# Altium PCB MiniDisplay.PcbDoc (part 1 of 2)
Units mil, origin at the board's own origin, x right, y up, seen from the top; angles counter-clockwise.
Board outline 1690.11 x 1520.11 mil, 2 copper layers (Top1, Bottom2), stack 12.8 mil thick; 78 components, 93 nets, 423 pads, 283 vias.
Unrouted connection lines stored in the file: 98.
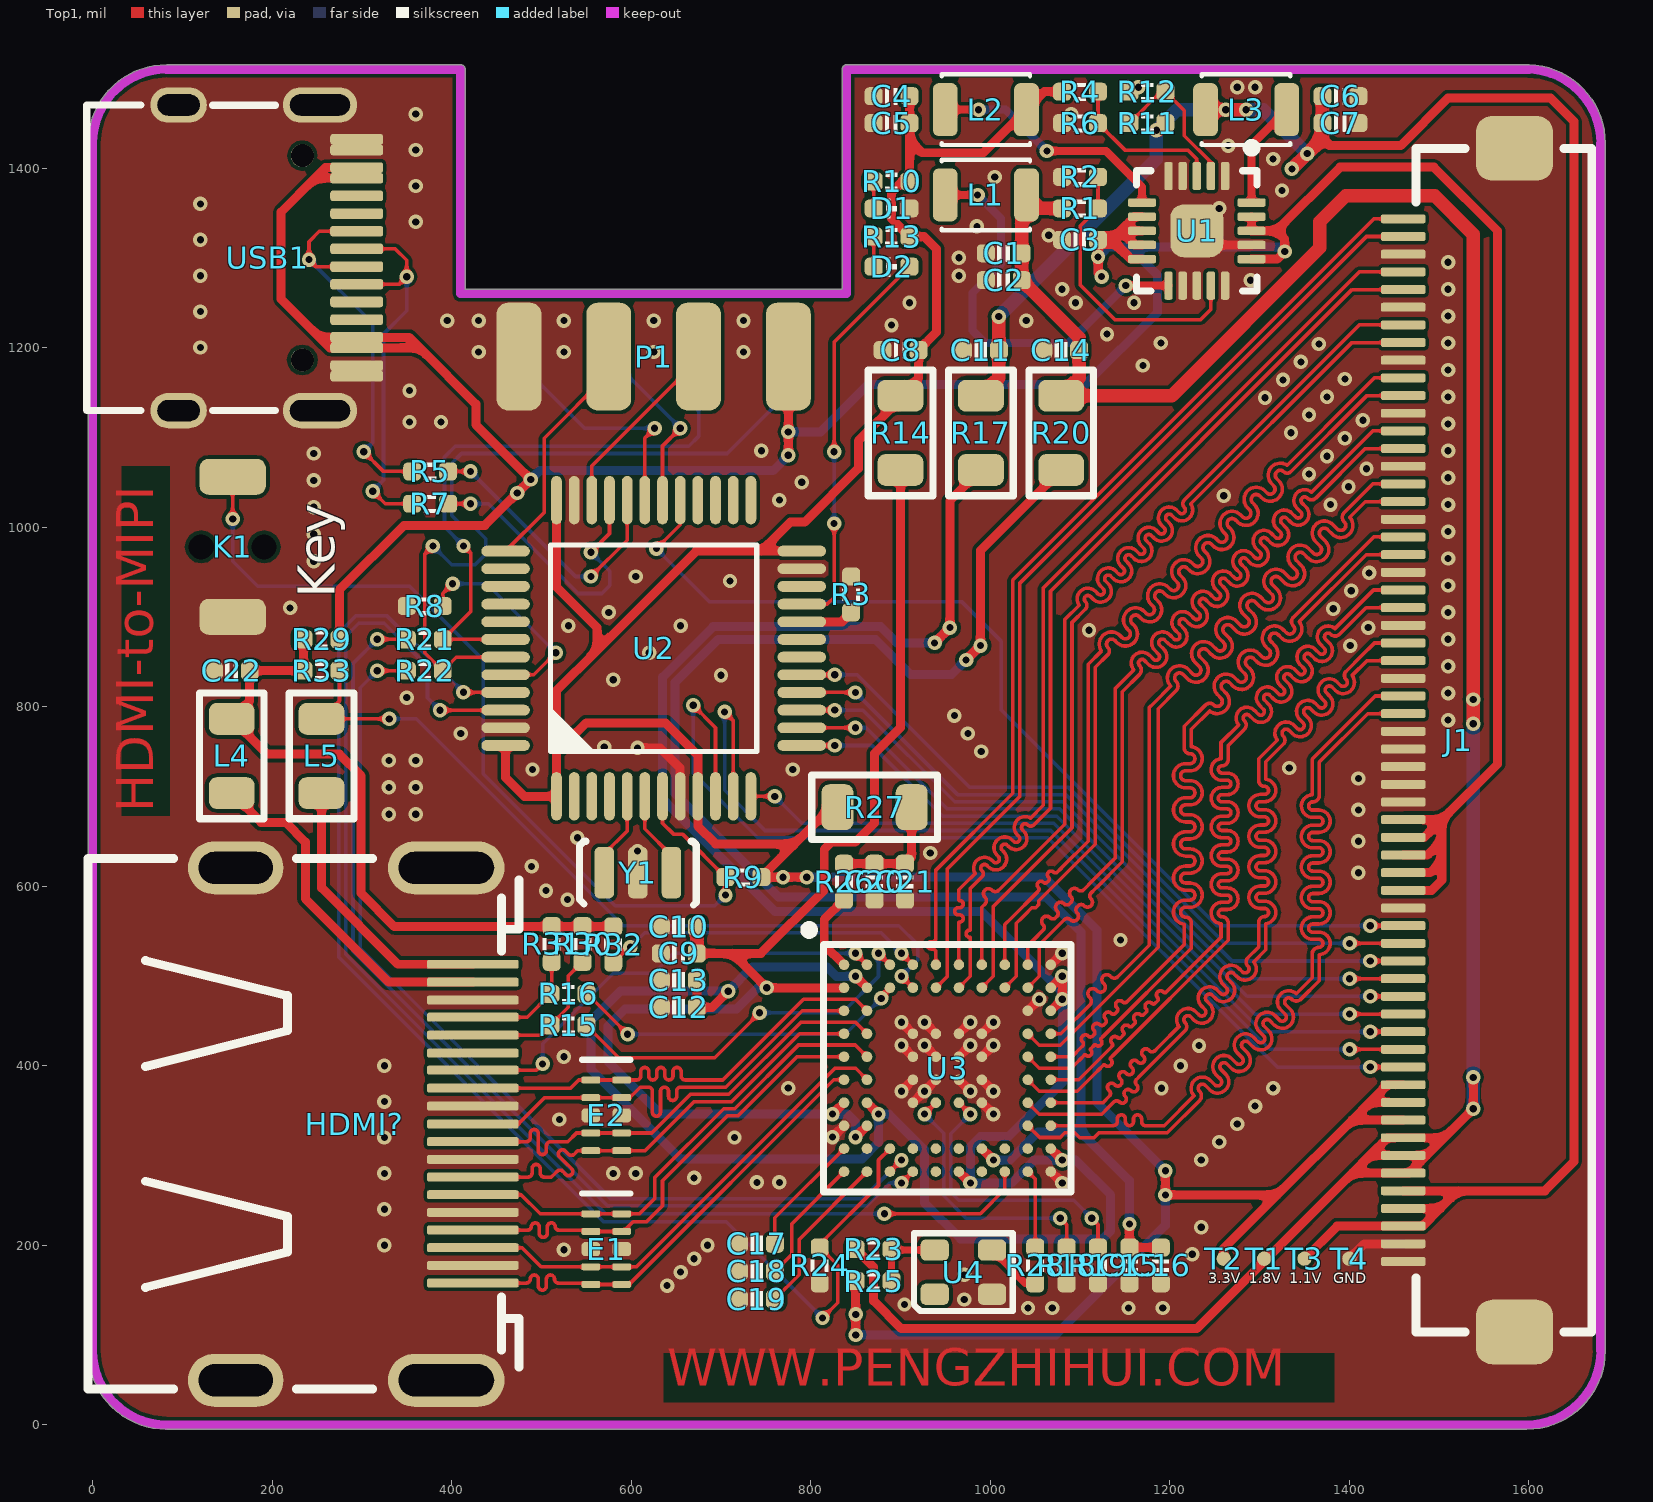
[diagram p0: Top1 view]
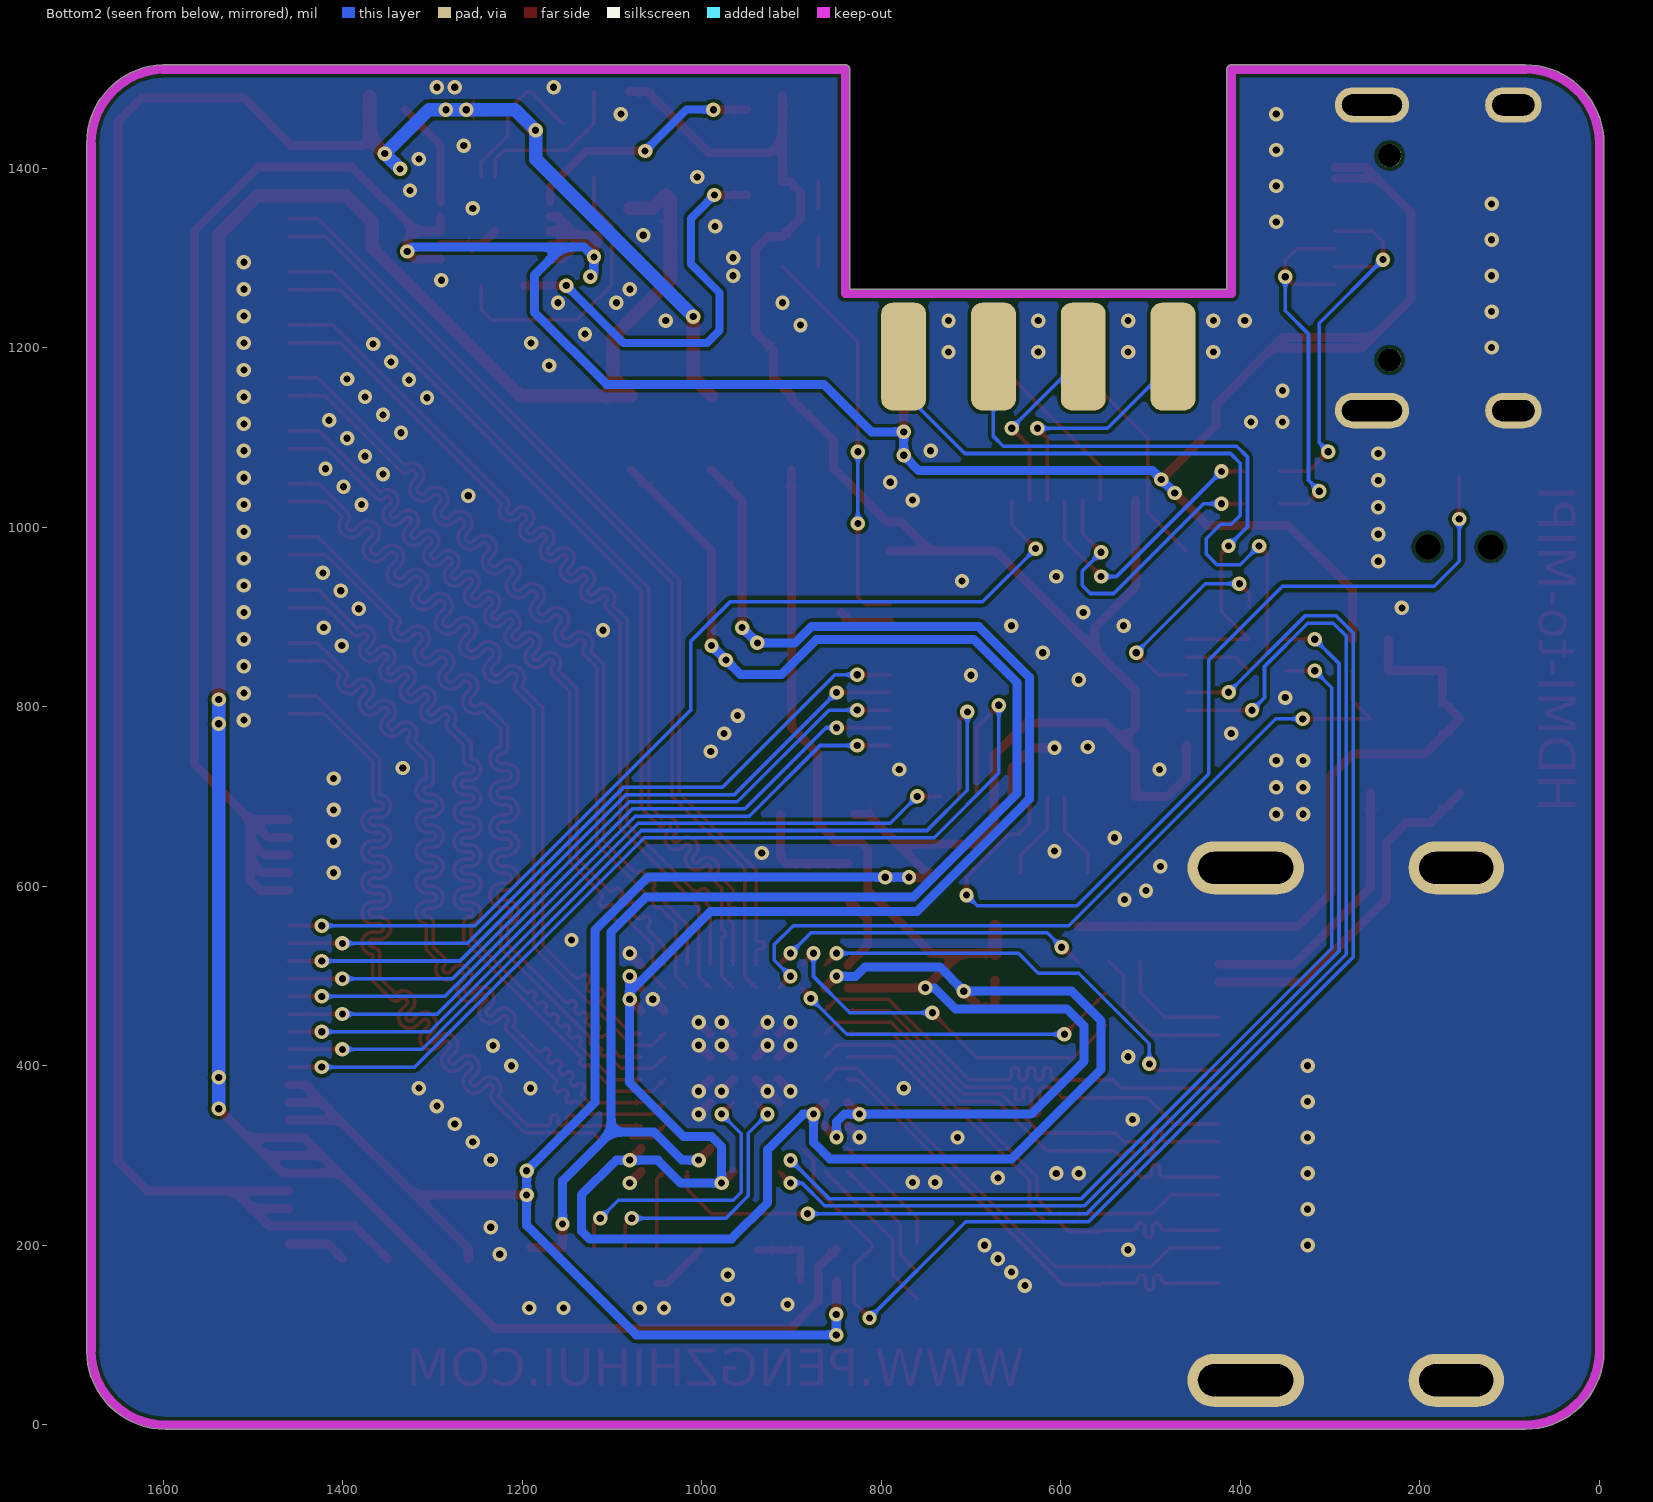
[diagram p1: Bottom2 view, seen from below]
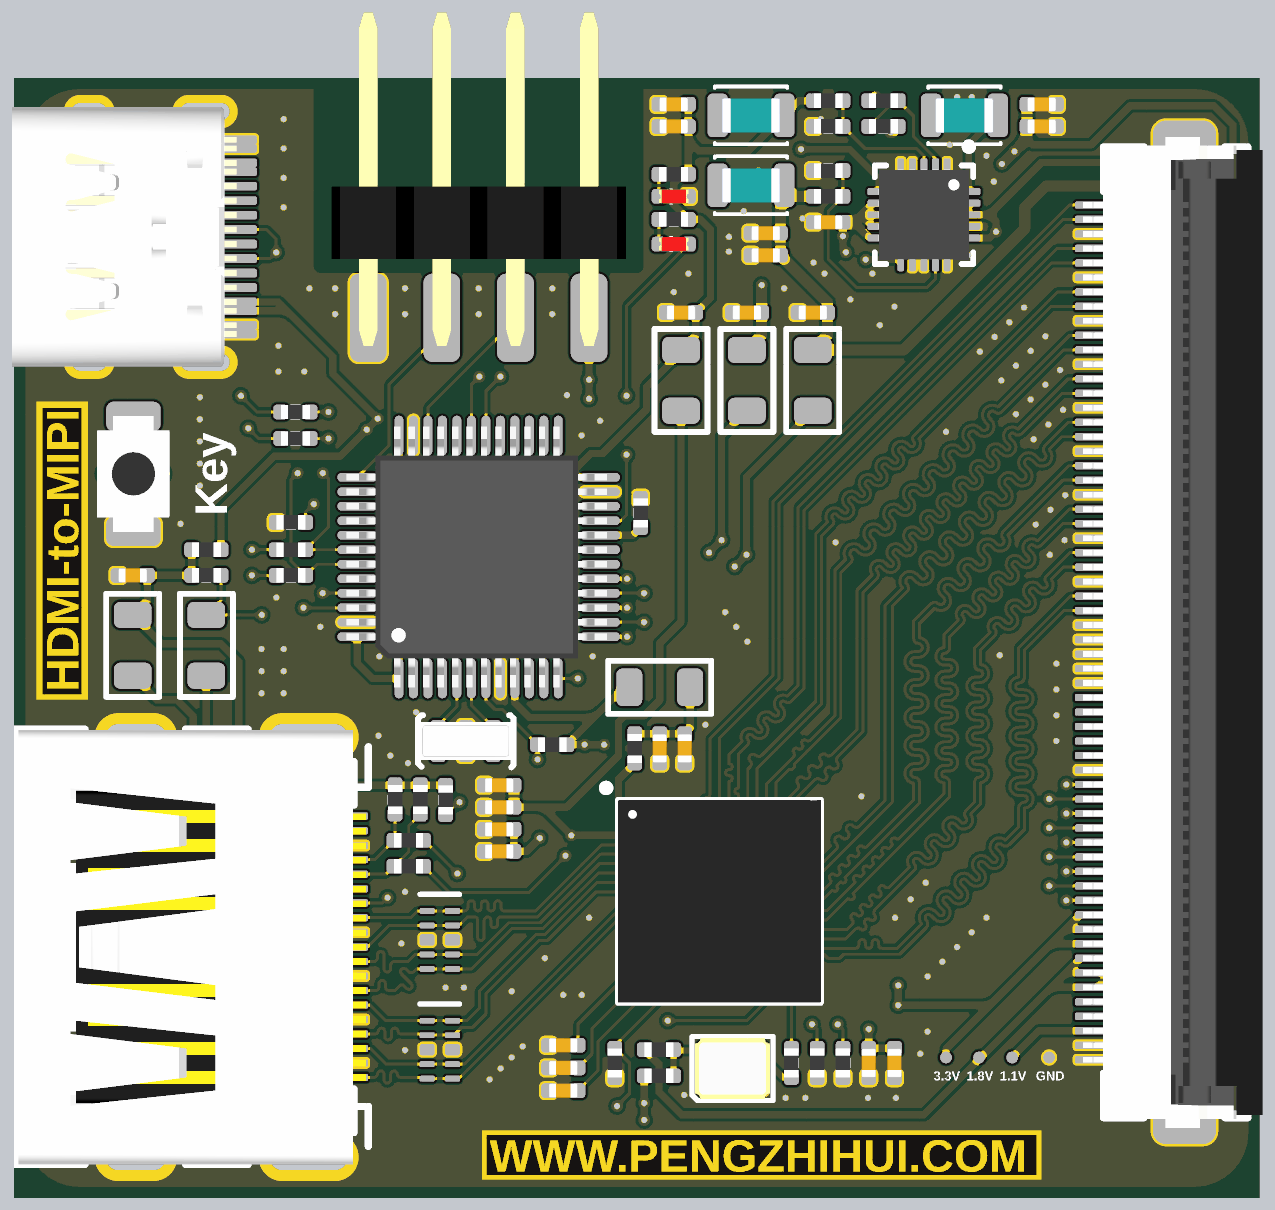
[diagram p3: 3D render of the assembled board from above, using the file's embedded part models]

## Layer stack, top to bottom
Top Solder: solder mask 0.4, Solder Resist, Dk 3.5
Top1: signal copper 1.4
Dielectric1: core 10, FR-4, Dk 4.2
Bottom2: signal copper 1.4
Bottom Solder: solder mask 0.4, Solder Resist, Dk 3.5

## Board outline
-5.01,82.45 cw(c0,82.5) -5.02,82.5 -5.02,1426.85 cw(c-0.04,1427.46) -5.05,1427.46 cw(c82.5,1427.46) 82.5,1515.02 410,1515.02 cw(c410,1510) 415.02,1510 415.02,1265.02 834.99,1265.02 834.99,1510 cw(c840,1510) 840,1515.02 1596.89,1515.02 cw(c1597.5,1510.04) 1597.5,1515.05 cw(c1597.5,1427.5) 1600.15,1515.01 cw(c1597.5,1427.5) 1685.05,1427.5 cw(c1680.04,1427.5) 1685.02,1426.88 1685.01,83.15 cw(c1680.04,82.54) 1685.05,82.54 cw(c1597.5,82.54) 1597.53,-5.01 cw(c1597.5,0) 1597.5,-5.02 83.15,-5.02 cw(c82.54,-0.04) 82.54,-5.05 cw(c82.54,82.5)

## Design rules (kind name [scope] priority, off if disabled: settings)
Clearance [All] p1: gap=4 ignorepadtopadclearanceinfootprint=FALSE except(0: Arc-Hole Track-Hole SMDPad-Hole THPad-Hole Via-Hole Fill-Hole Poly-Hole Region-Hole Text-Hole)
ComponentClearance [All] p1: gap=0 collisioncheckmode=3 verticalgap=0 showdistances=FALSE
DiffPairsRouting [All] p1: maxlimit=9 minlimit=4 mostfreqgap=4 toplayer_minwidth=4 toplayer_maxwidth=15 toplayer_prefwidth=4 bottomlayer_minwidth=4 bottomlayer_maxwidth=15 bottomlayer_prefwidth=4 maxuncoupledlength=500
FanoutControl Fanout_BGA [All] p1: bgadir=Out bgaviamode=Centered fanoutstyle=Auto fanoutdirection=Alternating viagrid=1 // Fanout_BGA (Default Rule)
HoleSize [All] p1: absolutevalues=TRUE maxlimit=10000 minlimit=8 maxpercent=80.000 minpercent=20.000
MinimumSolderMaskSliver [All] p1 off: minsoldermaskwidth=2
PlaneClearance [All] p1: clearance=8
PlaneConnect [All] p1: planeconnectstyle=Direct reliefexpansion=20 reliefentries=4 reliefconductorwidth=10 reliefairgap=10
PolygonConnect [All] p1: connectstyle=Direct reliefconductorwidth=10 reliefentries=4 polygonreliefangle="90 Angle" airgapwidth=10
RoutingVias [All] p1: holewidth=8 width=16 viastyle="Through Hole" minholewidth=6 minwidth=12 maxholewidth=28 maxwidth=50
SilkToSilkClearance [All] p1: silktosilkclearance=0
SilkToSolderMaskClearance [IsPad] p1: minsilkscreentomaskgap=0 clearancetoexposedcopper=TRUE
SolderMaskExpansion [All] p1: expansion=3
Width GND [(InNet('AGND') OR InNet('GND'))] p1: maxlimit=50 minlimit=4 preferedwidth=10
Width VCC [(InNet('VDD_SYS_3.3V') OR InNet('VDD_AV_3.3V') OR InNet('VDD_5V') OR InNet('VDD1V2-SYS') OR InNet('VDD1V1-EPHY') OR InNet('VDD-CPUX') OR InNet('NetC15_2') OR InNet('NetC9_2') OR InNet('NetC12_2'))] p2: maxlimit=50 minlimit=4 preferedwidth=10
Width [All] p3: maxlimit=10000 minlimit=4 preferedwidth=4
21 further rules are at their usual default settings.

## Classes and differential pairs
net class MIPI: MIPI0_D0_N MIPI0_D0_P MIPI0_D1_N MIPI0_D1_P MIPI0_D2_N MIPI0_D2_P MIPI0_D3_N MIPI0_D3_P MIPI0_DC_N MIPI0_DC_P MIPI1_D0_N MIPI1_D0_P MIPI1_D1_N MIPI1_D1_P MIPI1_D2_N MIPI1_D2_P MIPI1_D3_N MIPI1_D3_P MIPI1_DC_N MIPI1_DC_P
net class HDMI: HDMIC_N HDMIC_P HDMID0_N HDMID0_P HDMID1_N HDMID1_P HDMID2_N HDMID2_P
component class U_Connector: C22 E1 E2 HDMI? J1 L4 L5 R29 R30 R31 R32 R33
component class TC358870XBG: C8 C9 C10 C11 C12 C13 C14 C15 C16 C17 C18 C19 C20 C21 R14 R15 R16 R17 R18 R19 R20 R21 R22 R23 R24 R25 R26 R27 R28 U3 U4
component class Main: C1 C2 C3 C4 C5 C6 C7 D1 D2 K1 L1 L2 L3 P1 R1 R2 R3 R4 R5 R6 R7 R8 R9 R10 R11 R12 R13 T1 T2 T3 T4 U1 U2 USB1 Y1
differential pair MIPI1_DC: +MIPI1_DC_P -MIPI1_DC_N
differential pair MIPI1_D3: +MIPI1_D3_P -MIPI1_D3_N
differential pair MIPI1_D2: +MIPI1_D2_P -MIPI1_D2_N
differential pair MIPI1_D1: +MIPI1_D1_P -MIPI1_D1_N
differential pair MIPI1_D0: +MIPI1_D0_P -MIPI1_D0_N
differential pair MIPI0_DC: +MIPI0_DC_P -MIPI0_DC_N
differential pair MIPI0_D3: +MIPI0_D3_P -MIPI0_D3_N
differential pair MIPI0_D2: +MIPI0_D2_P -MIPI0_D2_N
differential pair MIPI0_D1: +MIPI0_D1_P -MIPI0_D1_N
differential pair MIPI0_D0: +MIPI0_D0_P -MIPI0_D0_N
differential pair HDMID2: +HDMID2_P -HDMID2_N
differential pair HDMID1: +HDMID1_P -HDMID1_N
differential pair HDMID0: +HDMID0_P -HDMID0_N
differential pair HDMIC: +HDMIC_P -HDMIC_N
differential pair USB: +USB_P -USB_N

## Components (designator, comment, footprint, x,y, rotation, side; value= is the part's Value field where it differs from the comment)
C1 "10uF" CAP_0402 1015,1305 r0 top value=0.1u
C2 "0.1uF" CAP_0402 1015,1275 r180 top value=0.1u
C3 "10uF" CAP_0402 1100,1320 r0 top value=0.1u
C4 "10uF" CAP_0402 890,1480 r0 top value=0.1u
C5 "0.1uF" CAP_0402 890,1450 r180 top value=0.1u
C6 "10uF" CAP_0402 1390,1480 r180 top value=0.1u
C7 "0.1uF" CAP_0402 1390,1450 r0 top value=0.1u
C8 "10uF" CAP_0402 900,1197.12 r0 top value=0.1u
C9 "10nF" CAP_0402 653,525 r0 top value=0.1u
C10 "0.1uF" CAP_0402 653,555 r0 top value=0.1u
C11 "10uF" CAP_0402 989.5,1197.12 r0 top value=0.1u
C12 "10nF" CAP_0402 653,465 r0 top value=0.1u
C13 "0.1uF" CAP_0402 653,495 r0 top value=0.1u
C14 "10uF" CAP_0402 1079,1197.12 r0 top value=0.1u
C15 "10nF" CAP_0402 1155,177.52 r90 top value=0.1u
C16 "0.1uF" CAP_0402 1190,177.52 r90 top value=0.1u
C17 "0.1uF" CAP_0402 740,201.61 r180 top value=0.1u
C18 "0.1uF" CAP_0402 740,170.81 r180 top value=0.1u
C19 "0.1uF" CAP_0402 740,140 r180 top value=0.1u
C20 "10nF" CAP_0402 871.02,605 r90 top value=0.1u
C21 "0.1uF" CAP_0402 905,605 r90 top value=0.1u
C22 "10uF" CAP_0402 155,840 r0 top value=0.1u
D1 "color?" LED_0402_RED 890,1355 r0 top
D2 "color?" LED_0402_RED 890,1290.16 r0 top
E1 "E?" DFN-2510 572.22,195.63 r270 top
E2 "E?" DFN-2510 572.22,344.69 r270 top
HDMI? "HDMI-SWM-19" HDMI-SWM-19 205,335 r90 top
J1 "0.5S_A_60PWB" FFC_0.5_60 1520,762.64 r90 top locked
K1 "TACT 2P" ButtonTACT_3x4x2_180H 156,978 r270 top value=3x4
L1 "2.2uH" 2520-L 995,1370 r0 top
L2 "2.2uH" 2520-L 995,1465 r0 top
L3 "2.2uH" 2520-L 1285,1465 r180 top
L4 "10uH" 0805-L 155,745 r270 top
L5 "10uH" 0805-L 255,745 r270 top
P1 "HDR2x4_2.54" HDR2X4_2.54_180H 475,1190 r90 top
R1 "200K" RES_0402 1100,1355 r180 top value=22R
R2 "100K" RES_0402 1100,1390 r0 top value=22R
R3 "10K" RES_0402 845,925 r90 top value=22R
R4 "510K" RES_0402 1100,1485 r180 top value=22R
R5 "22R" RES_0402 376,1062 r0 top
R6 "110K" RES_0402 1100,1450 r0 top value=22R
R7 "22R" RES_0402 376,1026 r0 top
R8 "10K" RES_0402 370,912 r180 top value=22R
R9 "10K" RES_0402 725,610 r0 top value=22R
R10 "1K" RES_0402 890,1385 r180 top value=22R
R11 "92K" RES_0402 1175,1450 r0 top value=22R
R12 "110K" RES_0402 1175,1485 r0 top value=22R
R13 "1K" RES_0402 890,1323.66 r180 top value=22R
R14 "120R磁珠" 0805-L 900,1105 r90 top value=22R
R15 "33R" RES_0402 530,445 r0 top value=22R
R16 "33R" RES_0402 530,480 r0 top value=22R
R17 "120R磁珠" 0805-L 989.5,1105 r90 top value=22R
R18 "10K" RES_0402 1085,177.52 r90 top value=22R
R19 "10K" RES_0402 1120,177.52 r90 top value=22R
R20 "120R磁珠" 0805-L 1079,1105 r90 top value=22R
R21 "33R" RES_0402 370,874.84 r180 top value=22R
R22 "33R" RES_0402 370,840 r180 top value=22R
R23 "0R" RES_0402 870,195.63 r180 top value=22R
R24 "47K" RES_0402 810,177.52 r270 top value=22R
R25 "NC" RES_0402 870,160 r180 top value=22R
R26 "2K 0.1%" RES_0402 837.05,605 r90 top value=22R
R27 "120R磁珠" 0805-L 871.02,688 r180 top value=22R
R28 "33R" RES_0402 1050,177.52 r90 top value=22R
R29 "NC?" RES_0402 255,875 r180 top value=22R
R30 "47K" RES_0402 545.71,535.63 r90 top value=22R
R31 "47K" RES_0402 511.42,535.63 r90 top value=22R
R32 "1K 1%" RES_0402 580,535 r90 top value=22R
R33 "1K 1%" RES_0402 255,840 r0 top value=22R
T1 "测试点" TEST_PT 1305,184.99 r0 top
T2 "测试点" TEST_PT 1260,184.99 r0 top
T3 "测试点" TEST_PT 1350,184.99 r0 top
T4 "测试点" TEST_PT 1400,185 r0 top
U1 "EA3036" QFN-20 1230,1330 r270 top
U2 "STM32F103CBT6" LQFP-48 625,865 r90 top
U3 "TC358870XBG" VFBGA-80 952.2,397.2 r0 top
U4 "晶振-4Pin" 晶振2520 970,170 r0 top
USB1 "Type-C" Type-C-TOP 195,1300 r180 top
Y1 "8MHz" 晶振-3P 607.4,615 r180 top

## Footprints (in the part's own frame and the unit in brackets; to place one, negate y for a bottom-side part, rotate by r counter-clockwise, add the part's x,y. Pads: shape width x height; smd on the part's side, far side on the other; paste and mask are expansions set on the pad)
0805-L [mm]
  rrect50% 0.9x1.3 smd: 1(-1.05,0) 2(1.05,0)
  silkscreen extent -1.78,-0.91 1.78,0.91, body extent -1,-0.6 1,0.6, height 0.76
2520-L [mm]
  rrect50% 0.7x1.5 smd: 1(-1.15,0) 2(1.15,0)
  silkscreen extent -1.25,-1 1.25,1, body extent -1,-0.6 1,0.6, height 0.92
ButtonTACT_3x4x2_180H [mil]
  round 0 hole 28: 0(0,35) 0(0,-35)
  rrect50% 40x74 smd: 1(-78,0) 2(78,0)
  body extent -79,-49 79,49, height 63
CAP_0402 [mil]
  rrect50% 20x20 smd: 1(-20,0) 2(20,0)
  silkscreen extent -6,-9 6,9, body extent -20,-10 20,10, height 20
DFN-2510 [mm]
  rrect50% 0.2x0.525 smd: 1(-1,-0.437) 2(-0.5,-0.437) 4(0.5,-0.437) 5(1,-0.437) 6(1,0.437) 7(0.5,0.437) 9(-0.5,0.437) 10(-1,0.437)
  rrect50% 0.4x0.525 smd: 3(0,-0.437) 8(0,0.437)
  silkscreen extent -1.57,-0.69 -1.57,0.69
FFC_0.5_60 [mil]
  rrect50% 72x86 smd: 0(-659.33,-63.98) 0(659.33,-63.98)
  rrect50% 10x50 smd: 1(-580.71,60) 2(-561.02,60) 3(-541.34,60) 4(-521.65,60) 5(-501.97,60) 6(-482.28,60) 7(-462.6,60) 8(-442.91,60) 9(-423.23,60) 10(-403.54,60) 11(-383.86,60) 12(-364.17,60) 13(-344.49,60) 14(-324.8,60) 15(-305.12,60) 16(-285.43,60) 17(-265.75,60) 18(-246.06,60) 19(-226.38,60) 20(-206.69,60) 21(-187.01,60) 22(-167.32,60) 23(-147.64,60) 24(-127.95,60) 25(-108.27,60) 26(-88.58,60) 27(-68.9,60) 28(-49.21,60) 29(-29.53,60) 30(-9.84,60) 31(9.84,60) 32(29.53,60) 33(49.21,60) 34(68.9,60) 35(88.58,60) 36(108.27,60) 37(127.95,60) 38(147.64,60) 39(167.32,60) 40(187.01,60) 41(206.69,60) 42(226.38,60) 43(246.06,60) 44(265.75,60) 45(285.43,60) 46(305.12,60) 47(324.8,60) 48(344.49,60) 49(364.17,60) 50(383.86,60) 51(403.54,60) 52(423.23,60) 53(442.91,60) 54(462.6,60) 55(482.28,60) 56(501.97,60) 57(521.65,60) 58(541.34,60) 59(561.02,60) 60(580.71,60)
  silkscreen extent -659,-150 659,46, body extent -673,-170 673,74, height 79
HDMI-SWM-19 [mm] "HDMI-SWM-19"
  rrect50% 0.254x2.6 smd: 1(-4.5,-5.55) 2(-4,-5.55) 3(-3.5,-5.55) 4(-3,-5.55) 5(-2.5,-5.55) 6(-2,-5.55) 7(-1.5,-5.55) 8(-1,-5.55) 9(-0.5,-5.55) 10(0,-5.55) 11(0.508,-5.55) 12(1.016,-5.55) 13(1.524,-5.55) 14(2.007,-5.55) 15(2.515,-5.55) 16(3.023,-5.55) 17(3.505,-5.55) 18(4.013,-5.55) 19(4.521,-5.55)
  oval 1.5x2.7 hole 2.1 slot 0.9 at 0 deg: SH1(-7.25,1.16) SH2(7.25,1.16)
  oval 1.5x3.3 hole 2.7 slot 0.9 at 0 deg: SH3(-7.25,-4.8) SH4(7.25,-4.8)
  silkscreen extent -7.5,-6.86 7.52,5.33, body extent -7.5,-6.78 7.5,5.22, height 6.14
HDR2X4_2.54_180H [mil]
  rrect50% 120x50 smd: 1(0,0) 3(0,-100) 5(0,-200) 7(0,-300)
  rrect50% 120x50 smd far side: 2(0,0) 4(0,-100) 6(0,-200) 8(0,-300)
  body extent -38,-350 415,50, height 100
LED_0402_RED [mil]
  rrect50% 20x20 smd: 1(-20,0) 2(20,0)
  silkscreen extent -6,-10 6,10, body extent -20,-10 20,10, height 18
LQFP-48 [mil]
  oval 54x12 smd: 1(-165,108.27) 2(-165,88.58) 3(-165,68.9) 4(-165,49.21) 5(-165,29.53) 6(-165,9.84) 7(-165,-9.84) 8(-165,-29.53) 9(-165,-49.21) 10(-165,-68.9) 11(-165,-88.58) 12(-165,-108.27) 25(165,-108.27) 26(165,-88.58) 27(165,-68.9) 28(165,-49.21) 29(165,-29.53) 30(165,-9.84) 31(165,9.84) 32(165,29.53) 33(165,49.21) 34(165,68.9) 35(165,88.58) 36(165,108.27)
  oval 12x54 smd: 13(-108.27,-165) 14(-88.58,-165) 15(-68.9,-165) 16(-49.21,-165) 17(-29.53,-165) 18(-9.84,-165) 19(9.84,-165) 20(29.53,-165) 21(49.21,-165) 22(68.9,-165) 23(88.58,-165) 24(108.27,-165) 37(108.27,165) 38(88.58,165) 39(68.9,165) 40(49.21,165) 41(29.53,165) 42(9.84,165) 43(-9.84,165) 44(-29.53,165) 45(-49.21,165) 46(-68.9,165) 47(-88.58,165) 48(-108.27,165)
  silkscreen extent -115,-115 115,115, body extent -177,-175 177,180, height 61
QFN-20 [mm] "QFN, 20-Leads, Body 3.00x3.00mm, Pitch 0.40mm, Thermal Pad 1.65x1.65mm, IPC Medium Density"
  rrect50% 0.8x0.24 smd: 1(-1.55,0.8) 2(-1.55,0.4) 3(-1.55,0) 4(-1.55,-0.4) 5(-1.55,-0.8) 11(1.55,-0.8) 12(1.55,-0.4) 13(1.55,0) 14(1.55,0.4) 15(1.55,0.8)
  rrect50% 0.24x0.8 smd: 6(-0.8,-1.55) 7(-0.4,-1.55) 8(0,-1.55) 9(0.4,-1.55) 10(0.8,-1.55) 16(0.8,1.55) 17(0.4,1.55) 18(0,1.55) 19(-0.4,1.55) 20(-0.8,1.55)
  rrect50% 1.5x1.5 smd: 21(0,0)
  silkscreen extent -2.47,-1.7 1.7,1.7, body extent -1.56,-1.56 1.56,1.56, height 0.8
RES_0402 [mil]
  rrect50% 20x20 smd: 1(-20,0) 2(20,0)
  silkscreen extent -7,-10 7,10, body extent -20,-10 20,10, height 14
TEST_PT [mil]
  rrect100% 16x16 smd: 0(0,0.01)
Type-C-TOP [mm]
  round 0.65 hole 0.65: 0(-0.98,2.89) 0(-0.98,-2.89)
  oval 1.6x1 hole 0.6 slot 1.2 at 0 deg: 1(2.52,4.325) 2(2.52,-4.325)
  oval 2.1x1 hole 0.6 slot 1.7 at 0 deg: 3(-1.48,-4.325) 4(-1.48,4.325)
  rrect50% 1.5x0.3 smd: A1(-2.52,-3.35) A4(-2.52,-2.55) A5(-2.52,-1.25) A6(-2.52,-0.25) A7(-2.52,0.25) A8(-2.52,1.25) A9(-2.52,2.55) A12(-2.52,3.35) B1(-2.52,3.05) B4(-2.52,2.25) B5(-2.52,1.75) B6(-2.52,0.75) B7(-2.52,-0.75) B8(-2.52,-1.75) B9(-2.52,-2.25) B12(-2.52,-3.05)
  silkscreen extent -0.22,-4.33 5.12,4.33, body extent -2.57,-4.48 5.18,4.48, height 3.26
VFBGA-80 [mm]
  round 0.3 smd paste+0 mask+0: A1(-2.925,2.925) A2(-2.275,2.925) A3(-1.625,2.925) A4(-0.975,2.925) A5(-0.325,2.925) A6(0.325,2.925) A7(0.975,2.925) A8(1.625,2.925) A9(2.275,2.925) A10(2.925,2.925) B1(-2.925,2.275) B2(-2.275,2.275) B3(-1.625,2.275) B4(-0.975,2.275) B5(-0.325,2.275) B6(0.325,2.275) B7(0.975,2.275) B8(1.625,2.275) B9(2.275,2.275) B10(2.925,2.275) C1(-2.925,1.625) C2(-2.275,1.625) C9(2.275,1.625) C10(2.925,1.625) D1(-2.925,0.975) D2(-2.275,0.975) D4(-0.975,0.975) D5(-0.325,0.975) D6(0.325,0.975) D7(0.975,0.975) D9(2.275,0.975) D10(2.925,0.975) E1(-2.925,0.325) E2(-2.275,0.325) E4(-0.975,0.325) E5(-0.325,0.325) E6(0.325,0.325) E7(0.975,0.325) E9(2.275,0.325) E10(2.925,0.325) F1(-2.925,-0.325) F2(-2.275,-0.325) F4(-0.975,-0.325) F5(-0.325,-0.325) F6(0.325,-0.325) F7(0.975,-0.325) F9(2.275,-0.325) F10(2.925,-0.325) G1(-2.925,-0.975) G2(-2.275,-0.975) G4(-0.975,-0.975) G5(-0.325,-0.975) G6(0.325,-0.975) G7(0.975,-0.975) G9(2.275,-0.975) G10(2.925,-0.975) H1(-2.925,-1.625) H2(-2.275,-1.625) H9(2.275,-1.625) H10(2.925,-1.625) J1(-2.925,-2.275) J2(-2.275,-2.275) J3(-1.625,-2.275) J4(-0.975,-2.275) J5(-0.325,-2.275) J6(0.325,-2.275) J7(0.975,-2.275) J8(1.625,-2.275) J9(2.275,-2.275) J10(2.925,-2.275) K1(-2.925,-2.925) K2(-2.275,-2.925) K3(-1.625,-2.925) K4(-0.975,-2.925) K5(-0.325,-2.925) K6(0.325,-2.925) K7(0.975,-2.925) K8(1.625,-2.925) K9(2.275,-2.925) K10(2.925,-2.925)
  silkscreen extent -4.04,-3.5 3.5,4.04, body extent -3.5,-3.5 3.5,3.5, height 1
晶振2520 [mm]
  rrect50% 0.8x0.6 smd: 1(-0.81,-0.625) 2(0.81,-0.625) 3(0.81,0.625) 4(-0.81,0.625)
  silkscreen extent -1.4,-1.1 1.4,1.1, body extent -1.3,-1.05 1.3,1.05, height 0.55
晶振-3P [mm] "贴片晶振"
  rrect50% 0.55x1.45 smd: 1(-0.95,0) 2(0,0) 3(0.95,0)
  silkscreen extent -1.65,-0.89 1.65,0.91, body extent -1.65,-0.89 1.65,0.89, height 0.8

## Part data
C1 C2 C3 C4 C5 C6 C7 C8 C9 C10 C11 C12 C13 C14 C15 C16 C17 C18 C19 C20 C21 C22: library part 电容-0402, "Capacitor"
D1 D2: library part LED_0402, "LED", Type=0402
E1 E2: library part AZ1045-04F
HDMI?: library part HDMI-MC34931HDMI-SWM-19
J1: library part FPC60-0.5mm, "Header, 60-Pin", LatestRevisionDate=17-Jul-2002, LatestRevisionNote="Re-released for DXP Platform.", Publisher="Altium Limited"
K1: library part ButtonTACT_3x4x2_180, "Button", Type="TACT 2P"
L1 L2 L3: library part 电感-2520, "磁珠"
L4 L5: library part 电感-0805, "磁珠"
P1: "Header"
R1 R2 R3 R4 R5 R6 R7 R8 R9 R10 R11 R12 R13 R15 R16 R18 R19 R21 R22 R23 R24 R25 R26 R28 R29 R30 R31 R32 R33: library part 电阻-0402, "Resistor"
R14 R17 R20 R27: library part 电阻-0805, "Resistor"
U1: "EA3036 is a 3CH power management IC for applications powered by one Li-Ion battery or a DC 5V adapter."
U2: "ARM Cortex-M3 32-bit MCU, 128 KB Flash, 20 KB Internal RAM, 37 I/Os, 48-pin LQFP, -40 to 85 degC, Tray", I/Os (High Current)=37, Operating Frequency(F) (Processor speed) (MHz)=72, Supplier Part Number 1=497-6288-ND, Supply Voltage(Vcc) min (V)=2, A/D Converter="2x12-bit (10 Channel)", ComponentLink1Description="Manufacturer URL", ComponentLink1URL=http://www.st.com/web/en/home.html, ComponentLink2Description=Datasheet, ComponentLink2URL=http://www.st.com/st-web-ui/static/active/en/resource/technical/document/datasheet/CD00161566.pdf, ComponentLink3Description="Package Specification", ComponentLink3URL=http://www.st.com/st-web-ui/static/active/en/resource/technical/document/datasheet/DM00058181.pdf, Core="ARM Cortex-M3", DatasheetVersion="Rev. 16", FLASH Size (Prog) (kB)=128, Internal RAM Size (kB)=20, Mounting Technology="Surface Mount", PackageDescription="48-Pin Low Profile Quad Flat Package, 7 x 7 mm Body, 0.5 mm Pitch", PackageReference=LQFP48, PackageVersion="Rev. 6, 06/2013", Packing=Tray, PartNumber=STM32F103CBT6, Supplier 1=Digi-Key, Supplier 2=Farnell, Supplier 3=Newark, Supplier 4=Newark, Supplier 5=Mouser, Supplier Part Number 2=1606327, Supplier Part Number 3=11N8296, Supplier Part Number 4=57P1214, Supplier Part Number 5=511-STM32F103CBT6
U4: "5032 有源"
USB1: library part USB-Type-C-TOP
Y1: library part 晶振-3Pin, "村田贴片"

## Via types
v1: diameter 16, hole 8, Top1 to Bottom2, tented both sides, 283 vias

## Nets (pads, with @x,y where several pads share a name; then routed paths per layer and width w, separated by ;. In a path a pad name is that pad's centre, name@x,y a point inside that pad or via, vN(x,y) a via of type N, cw(c..) or ccw(c..) an arc to the next point about the centre after c; other vN are vias at no path point)
B_REFCLK: R28.2 U3.K9 | length 87.9
  Top1 w4: U3.K9@1041.77,282.05 1050,273.82 R28.2@1050,197.52
B_RESX: U2.46 U3.K8 | length 1484
  Top1 w4: v1(387,796) 459.9,796 U2.46@460,796.1 ; v1(882,235) 989,235 1016.18,262.18 U3.K8@1016.18,282.05
  Bottom2 w4: v1(387,796) 373,810 373,844.69 324.69,893 296.31,893 282,878.69 282,524.31 571.31,235 v1(882,235)
BOOT0: R8.1 U2.44 | length 242.5
  Top1 w4: R8.1@390,912 390,925.93 v1(401,936.93) ; U2.44@460,835.47 491.47,835.47 v1(516,860)
  Bottom2 w4: v1(401,936.93) 439.07,936.93 v1(516,860)
BOOT1: R3.1 U2.20 | length 59.3
  Top1 w10: U2.20@790,894.53 834.53,894.53 R3.1@845,905
CEC: HDMI?.13 U3.A2 | length 511.4
  Top1 w4: HDMI?.13@423.5,395 494.32,395 v1(501.32,402) ; v1(849.84,525.16) U3.A2@862.64,512.36
  Bottom2 w4: v1(501.32,402) 501.32,424.29 580.02,503 625,503 647.16,525.16 v1(849.84,525.16)
D_SWCLK: P1.3 U2.37 | length 264.4
  Top1 w4: U2.37@460,973.27 503,1016.27 503,1099 575,1171 P1.3@575,1190
D_SWDIO: P1.5 U2.34 | length 209.2
  Top1 w4: U2.34@556.1,1030 556.1,1068.1 675,1187 P1.5@675,1190
GND: C1.1 C2.2 C3.1 C4.1 C5.2 C6.1 C7.2 C8.1 C9.1 C10.1 C11.1 C12.1 C13.1 C14.1 C15.1 C16.1 C17.2 C18.2 C19.2 C20.1 C21.1 C22.1 D1.2 E1.3 E1.8 E2.3 E2.8 HDMI?.2 HDMI?.5 HDMI?.8 HDMI?.11 HDMI?.17 HDMI?.SH1 HDMI?.SH2 HDMI?.SH3 HDMI?.SH4 J1.0 J1.1 J1.2 J1.21 J1.27 J1.28 J1.29 J1.30 J1.31 J1.34 J1.37 J1.40 J1.43 J1.46 J1.49 J1.52 J1.55 J1.58 K1.2 P1.1 R2.1 R3.2 R6.1 R8.2 R12.1 R18.1 R19.1 R24.2 T4.0 U1.1 U1.4 U1.5 U1.12 U1.13 U1.15 U1.17 U1.21 U2.8 U2.23 U2.35 U2.47 U3.A10 U3.C9 U3.D4 U3.D5 U3.D6 U3.D7 U3.E4 U3.E5 U3.E6 U3.E7 U3.F4 U3.F5 U3.F6 U3.F7 U3.G4 U3.G7 U3.H1 U3.K10 U4.2 USB1.1 USB1.2 USB1.3 USB1.4 USB1.A1 USB1.A12 USB1.B1 USB1.B12 Y1.2 | length 548.5
  Top1 w10: v1(607,754) 632,754 654.53,731.47 U2.8@654.53,700 ; v1(824.25,320.43) U3.H1@837.05,333.23 ; v1(901.02,371.61) U3.F4@913.82,384.41 ; v1(901.02,422.8) U3.E4@913.82,410 ; v1(901.02,448.39) U3.D4@913.82,435.59 ; U3.G4@913.82,358.82 v1(926.61,371.61) U3.F5@939.41,384.41 ; v1(926.61,422.8) U3.E5@939.41,410 ; v1(926.61,448.39) U3.D5@939.41,435.59 ; U3.F6@965,384.41 v1(977.8,371.61) ; U3.E6@965,410 v1(977.8,422.8) ; U3.D6@965,435.59 v1(977.8,448.39) ; U3.G7@990.59,358.82 v1(1003.39,346.02) ; U3.F7@990.59,384.41 v1(1003.39,371.61) ; U3.E7@990.59,410 v1(1003.39,422.8) ; U3.D7@990.59,435.59 v1(1003.39,448.39) ; U3.C9@1041.77,461.18 v1(1054.57,473.98) ; U3.K10@1067.36,282.05 v1(1080.16,269.25) ; U3.A10@1067.36,512.36 v1(1080.16,525.16) ; U1.21@1230,1330 1245.75,1314.25 U1.17@1291.02,1314.25 ; T4.0@1400,185.01 1416.61,201.61 J1.2@1460,201.61
  other v1: 1042,130 1069,130 1154,130 1192,130 904.37,134 971,139.49 640,155 971,167 655,170 670,185 1225,190 525,195 325,200 685,200 1235,220 325,240 740,270 765,270 670,275 325,280 580,280 605,280 1235,295 1255,315 325,320 715,320 1275,335 520,340 1295,355 325,360 775,375 1190.75,374.9 1315,375 325,400 1212,400 525,410 1232.46,422.38 1145,540 529,585 505,595 1410,615 489,622 933,637 607,639 1410,650 540,654 330,680 360,680 1410,685 330,710 360,710 1410,720 490,730 780,730 1333,731.59 330,740 360,740 990,750 570,755 410,770 975,770 1510,785 960,790 350,810 1510,815 580,830 700,835 1510,845 620,860 1401,868 1510,875 1110,885 1421,888 530,890 655,890 575,905 1510,905 1382,909 220,910 1402,929 1510,935 710,940 605,945 1422,949 246.28,962 1510,965 246.28,992 1510,995 246.28,1022 1379,1025 1510,1025 765,1030 1260,1035 1399,1045 790,1050 246.28,1052 1510,1055 1355,1059 1419,1065 1375,1079 246.28,1082 745,1085 1510,1085 1395,1099 1335,1105 1510,1115 353,1117 388,1117 1415,1119 1355,1125 1306,1144 1375,1145 1510,1145 353,1152 1326,1164 1395,1165 1510,1175 1170,1180 1346,1184 430,1195 525,1195 625,1195 725,1195 120,1200 1366,1204 1190,1205 1510,1205 1130,1215 890,1225 395,1230 430,1230 525,1230 625,1230 725,1230 1040,1230 1510,1235 120,1240 910,1250 1095,1250 1160,1250 1080,1265 1510,1265 1290,1275 120,1280 965,1280 1510,1295 965,1300 120,1320 1065,1325 985,1335 360,1340 1255,1355 120,1360 1325,1375 360,1380 1005,1390 1315,1410 360,1420 1265,1425 360,1460 1090,1460 1165,1490 1275,1490 1295,1490
HDMIC_N: E2.1 E2.10 HDMI?.12 U3.C2 | length 545.9
  Top1 w4: HDMI?.12@423.5,375 532.44,375 541.49,384.06 E2.1@555,384.06 E2.10@589.45,384.06 606,384.06 ccw(c606,388.56) 610.5,388.56 610.5,393.5 cw(c615,393.5) 615,398 cw(c615,393.5) 619.5,393.5 619.5,388.56 ccw(c624,388.56) 624,384.06 ccw(c624,388.56) 628.5,388.56 628.5,393.5 cw(c633,393.5) 633,398 cw(c633,393.5) 637.5,393.5 637.5,388.56 ccw(c642,388.56) 642,384.06 ccw(c642,388.56) 646.5,388.56 646.5,393.5 cw(c651,393.5) 651,398 cw(c651,393.5) 655.5,393.5 655.5,388.56 ccw(c660,388.56) 660,384.06 664.5,384.06 673,384.06 702.06,384.06 791.98,473.98 849.84,473.98 U3.C2@862.64,461.18
HDMIC_P: E2.2 E2.9 HDMI?.10 U3.C1 | length 544.6
  Top1 w4: HDMI?.10@423.5,335 474,335 503.37,364.37 E2.2@555,364.37 E2.9@589.45,364.37 598.37,364.37 610.06,376.06 614.56,376.06 619.06,376.06 cw(c619.06,371.56) 623.56,371.56 623.56,348.24 ccw(c628.06,348.24) 628.06,343.74 ccw(c628.06,348.24) 632.56,348.24 632.56,371.56 cw(c637.06,371.56) 637.06,376.06 cw(c637.06,371.56) 641.56,371.56 641.56,365.73 ccw(c646.06,365.73) 646.06,361.23 ccw(c646.06,365.73) 650.56,365.73 650.56,371.56 cw(c655.06,371.56) 655.06,376.06 657,376.06 705.37,376.06 790.49,461.18 U3.C1@837.05,461.18
HDMID0_N: E2.4 E2.7 HDMI?.9 U3.D2 | length 544
  Top1 w4: HDMI?.9@423.5,315.32 483,315.32 ccw(c483,319.82) 487.5,319.82 487.5,324.5 cw(c492,324.5) 492,329 cw(c492,324.5) 496.5,324.5 496.5,315.32 496.5,305.5 ccw(c501,305.5) 501,301 ccw(c501,305.5) 505.5,305.5 505.5,310.82 cw(c510,310.82) 510,315.32 513,315.32 529.32,315.32 539,325 E2.4@555,325 E2.7@589.45,325 623,325 666.06,368.06 708.68,368.06 789.01,448.39 849.84,448.39 U3.D2@862.64,435.59
HDMID0_P: E2.5 E2.6 HDMI?.7 U3.D1 | length 544.4
  Top1 w4: HDMI?.7@423.5,275.94 485,275.94 ccw(c485,280.44) 489.5,280.44 489.5,285.45 cw(c494,285.45) 494,289.95 cw(c494,285.45) 498.5,285.45 498.5,280.44 ccw(c503,280.44) 503,275.94 507.5,275.94 510.94,275.94 514.13,279.13 517.31,282.31 cw(c520.49,279.13) 523.67,282.31 527.21,278.77 ccw(c530.39,281.96) 533.57,278.77 ccw(c530.39,281.96) 533.57,285.14 526.85,291.85 520.14,298.57 cw(c523.32,301.75) 520.14,304.94 cw(c523.32,301.75) 526.5,304.94 530.04,301.4 ccw(c533.22,304.58) 536.4,301.4 539.58,304.58 540.31,305.31 E2.5@555,305.31 E2.6@589.45,305.31 615.31,305.31 670.06,360.06 712,360.06 787.53,435.59 U3.D1@837.05,435.59
HDMID1_N: E1.1 E1.10 HDMI?.6 U3.E2 | length 544.8
  Top1 w4: HDMI?.6@423.5,256.26 477.24,256.26 498.5,235 E1.1@555,235 E1.10@589.45,235 609.16,235 626,251.84 626,275 703.06,352.06 715.31,352.06 786.25,423 849.64,423 U3.E2@862.64,410
HDMID1_P: E1.2 E1.9 HDMI?.4 U3.E1 | length 544.6
  Top1 w4: HDMI?.4@423.5,216.89 484,216.89 485,216.89 ccw(c485,220.39) 488.5,220.39 cw(c493,220.39) 493,224.89 cw(c493,220.39) 497.5,220.39 497.5,216.89 497.5,213.39 ccw(c502,213.39) 502,208.89 ccw(c502,213.39) 506.5,213.39 506.5,216.89 506.5,220.39 cw(c511,220.39) 511,224.89 cw(c511,220.39) 515.5,220.39 ccw(c519,220.39) 519,216.89 521,216.89 553.43,216.89 E1.2@555,215.31 E1.9@589.45,215.31 591.37,215.31 602.05,226 617,226 634.84,243.84 634.84,271.84 707.06,344.06 718.62,344.06 784.57,410 U3.E1@837.05,410
HDMID2_N: E1.4 E1.7 HDMI?.3 U3.F2 | length 544.7
  Top1 w4: HDMI?.3@423.5,197.2 478.3,197.2 499.56,175.94 E1.4@555,175.94 E1.7@589.45,175.94 605.94,175.94 827,397 850.05,397 U3.F2@862.64,384.41
HDMID2_P: E1.5 E1.6 HDMI?.1 U3.F1 | length 544.9
  Top1 w4: HDMI?.1@423.5,157.83 483,157.83 ccw(c483,162.33) 487.5,162.33 cw(c492,162.33) 492,166.83 cw(c492,162.33) 496.5,162.33 496.5,157.83 496.5,154.5 ccw(c501,154.5) 501,150 ccw(c501,154.5) 505.5,154.5 505.5,157.83 505.5,162.33 cw(c510,162.33) 510,166.83 cw(c510,162.33) 514.5,162.33 ccw(c519,162.33) 519,157.83 521,157.83 553.43,157.83 E1.5@555,156.26 E1.6@589.45,156.26 597.57,156.26 825.72,384.41 U3.F1@837.05,384.41
HPDI: R32.1 U3.A4 | length 362.2
  Top1 w4: R32.1@580,515 597,532 v1(599,532) ; v1(901.02,525.16) U3.A4@913.82,512.36
  Bottom2 w4: v1(599,532) 615,548 878.18,548 v1(901.02,525.16)
HPDO: L5.1 R33.2 U3.B4 | length 891
  Top1 w4: R33.2@275,840 275,806.34 L5.1@255,786.34 v1(330.34,786.34) ; v1(901.02,499.57) U3.B4@913.82,486.77
  Bottom2 w4: v1(330.34,786.34) 360.66,786.34 591,556 898,556 919,535 919,517.54 v1(901.02,499.57)
INT: R24.1 U2.45 U3.J3 | length 1528.6
  Top1 w4: v1(413,816) 413.21,815.79 U2.45@460,815.79 ; R24.1@810,197.52 830,177.52 830,136 v1(813,119) ; R24.1@810,201 875.43,266.43 875.43,294.84 U3.J3@888.23,307.64
  Bottom2 w4: v1(413,816) 328,901 293,901 274,882 274,521 569,226 706,226 v1(813,119)
MIPI0_D0_N: J1.32 U3.H9 | length 1077.6
  Top1 w4: U3.H9@1041.77,333.23 1055,320 1077.77,320 1083,325.23 1094,325.23 1099.51,319.73 1115.5,319.73 1121,325.23 1197.15,325.23 1233,361.07 ccw(c1227.69,366.38) 1235.19,366.38 ccw(c1227.69,366.38) 1233,371.68 cw(c1236.18,374.86) 1232.98,378.03 ; 1233,378.04 cw(c1236.18,374.86) 1239.36,378.04 1244.31,373.09 ccw(c1253.15,381.93) 1265.65,381.93 ccw(c1253.15,381.93) 1261.99,390.77 1257.04,395.72 cw(c1260.22,398.9) 1257.02,402.07 cw(c1260.22,398.9) 1263.4,402.09 1268.35,397.14 ccw(c1277.19,405.97) 1289.69,405.97 ccw(c1277.19,405.97) 1286.03,414.81 1281.08,419.76 cw(c1284.26,422.95) 1281.07,426.11 cw(c1284.26,422.95) 1287.44,426.13 1292.39,421.18 ccw(c1301.23,430.02) 1313.73,430.02 ccw(c1301.23,430.02) 1310.07,438.86 1305.12,443.81 cw(c1308.3,446.99) 1305.11,450.15 cw(c1308.3,446.99) 1311.49,450.17 1316.44,445.22 ccw(c1325.27,454.06) 1337.77,454.06 ccw(c1325.27,454.06) 1334.11,462.9 1329.16,467.85 cw(c1332.35,471.03) 1329.15,474.2 ; 1329.16,474.21 cw(c1332.35,471.03) 1335.53,474.21 ccw(c1340.83,479.51) 1346.13,474.21 1366.56,494.64 1366.56,523.8 ccw(c1366.06,536.29) 1378.56,536.29 ccw(c1366.06,536.29) 1366.06,548.79 1359.06,548.79 cw(c1359.06,553.29) 1359.06,557.79 1366.06,557.79 ccw(c1366.06,570.29) 1378.56,570.29 ccw(c1366.06,570.29) 1366.06,582.79 1359.06,582.79 cw(c1359.06,587.29) 1359.06,591.79 1366.06,591.79 ccw(c1366.06,604.29) 1378.56,604.29 ccw(c1366.06,604.29) 1366.06,616.79 1359.06,616.79 cw(c1359.06,621.29) 1359.06,625.79 1366.06,625.79 ccw(c1366.06,638.29) 1378.56,638.29 ccw(c1366.06,638.29) 1366.06,650.79 1359.06,650.79 cw(c1359.06,655.29) 1359.06,659.79 1366.06,659.79 ccw(c1366.06,672.29) 1378.56,672.29 ccw(c1366.06,672.29) 1366.06,684.79 1359.06,684.79 cw(c1359.06,689.29) 1359.06,693.79 ccw(c1359.06,701.29) 1366.56,701.29 1366.56,738.25 1420.48,792.16 J1.32@1460,792.16
MIPI0_D0_P: J1.33 U3.H10 | length 1076.8
  Top1 w4: U3.H10@1067.36,333.23 1083,333.23 1137,333.23 ccw(c1137,337.73) 1141.5,337.73 1141.5,340.73 cw(c1146,340.73) 1146,345.23 cw(c1146,340.73) 1150.5,340.73 1150.5,337.73 ccw(c1155,337.73) 1155,333.23 ccw(c1155,337.73) 1159.5,337.73 1159.5,340.73 cw(c1164,340.73) 1164,345.23 cw(c1164,340.73) 1168.5,340.73 1168.5,337.73 ccw(c1173,337.73) 1173,333.23 1193.84,333.23 1226.99,366.38 cw(c1236.18,374.86) 1245.02,383.7 1249.97,378.75 ccw(c1253.15,381.93) 1256.32,378.74 ; 1256.33,378.75 ccw(c1253.15,381.93) 1257.65,381.93 ccw(c1253.15,381.93) 1256.33,385.12 1251.38,390.07 cw(c1260.22,398.9) 1269.06,407.74 1274.01,402.79 ccw(c1277.19,405.97) 1280.36,402.78 ccw(c1277.19,405.97) 1281.69,405.97 ccw(c1277.19,405.97) 1280.37,409.16 1275.42,414.11 cw(c1284.26,422.95) 1293.1,431.78 1298.05,426.83 ccw(c1301.23,430.02) 1304.4,426.82 ; 1304.42,426.83 ccw(c1301.23,430.02) 1305.73,430.02 ccw(c1301.23,430.02) 1304.42,433.2 1299.47,438.15 cw(c1308.3,446.99) 1317.14,455.83 1322.09,450.88 ccw(c1325.27,454.06) 1328.44,450.86 ; 1328.46,450.88 ccw(c1325.27,454.06) 1329.77,454.06 ccw(c1325.27,454.06) 1328.46,457.24 1323.51,462.19 cw(c1332.35,471.03) 1340.82,480.21 1358.56,497.95 1358.56,524.29 cw(c1366.06,524.29) 1366.06,531.79 ccw(c1366.06,536.29) 1370.56,536.29 ccw(c1366.06,536.29) 1366.06,540.79 1359.06,540.79 cw(c1359.06,553.29) 1359.06,565.79 1366.06,565.79 ccw(c1366.06,570.29) 1370.56,570.29 ccw(c1366.06,570.29) 1366.06,574.79 1359.06,574.79 cw(c1359.06,587.29) 1359.06,599.79 1366.06,599.79 ccw(c1366.06,604.29) 1370.56,604.29 ccw(c1366.06,604.29) 1366.06,608.79 1359.06,608.79 cw(c1359.06,621.29) 1359.06,633.79 1366.06,633.79 ccw(c1366.06,638.29) 1370.56,638.29 ccw(c1366.06,638.29) 1366.06,642.79 1359.06,642.79 cw(c1359.06,655.29) 1359.06,667.79 1366.06,667.79 ccw(c1366.06,672.29) 1370.56,672.29 ccw(c1366.06,672.29) 1366.06,676.79 1359.06,676.79 cw(c1359.06,689.29) 1358.56,701.78 1358.56,741.56 1414.82,797.82 1428.85,811.85 J1.33@1460,811.85
MIPI0_D1_N: J1.35 U3.G9 | length 1076.1
  Top1 w4: U3.G9@1041.77,358.82 1054.57,346.02 1067.36,346.02 1124.02,346.02 1131.16,353.16 1134.34,356.34 1137.53,359.53 cw(c1140.71,356.34) 1143.89,359.53 ccw(c1147.07,362.71) 1150.25,359.53 ccw(c1147.07,362.71) 1150.25,365.89 cw(c1153.44,369.07) 1150.25,372.25 cw(c1153.44,369.07) 1156.62,372.25 ccw(c1159.8,375.44) 1162.98,372.25 ccw(c1159.8,375.44) 1162.98,378.62 cw(c1166.16,381.8) 1162.98,384.98 1166.16,388.16 1167,389 1216.9,438.9 ccw(c1212.3,443.5) 1218.8,443.5 ccw(c1212.3,443.5) 1216.9,448.09 cw(c1220.08,451.27) 1216.88,454.44 ; 1216.9,454.46 cw(c1220.08,451.27) 1223.26,454.46 1226.8,450.92 ccw(c1235.64,459.76) 1248.14,459.76 ccw(c1235.64,459.76) 1244.48,468.6 1240.94,472.13 cw(c1244.12,475.32) 1240.93,478.48 ; 1240.94,478.5 cw(c1244.12,475.32) 1247.3,478.5 1250.84,474.96 ccw(c1259.68,483.8) 1272.18,483.8 ccw(c1259.68,483.8) 1268.52,492.64 1264.98,496.18 cw(c1268.16,499.36) 1264.97,502.52 cw(c1268.16,499.36) 1271.35,502.54 1274.88,499 ccw(c1283.72,507.84) 1296.22,507.84 ccw(c1283.72,507.84) 1293.56,515.56 1307,529 1307,558.25 ccw(c1305.5,570.66) 1318,570.66 ccw(c1305.5,570.66) 1305.5,583.16 1300.5,583.16 cw(c1300.5,587.66) 1300.5,592.16 1305.5,592.16 ccw(c1305.5,604.66) 1318,604.66 ccw(c1305.5,604.66) 1305.5,617.16 1300.5,617.16 cw(c1300.5,621.66) 1300.5,626.16 1305.5,626.16 ccw(c1305.5,638.66) 1318,638.66 ccw(c1305.5,638.66) 1305.5,651.16 1300.5,651.16 cw(c1300.5,655.66) 1300.5,660.16 1305.5,660.16 ccw(c1305.5,672.66) 1318,672.66 ccw(c1305.5,672.66) 1305.5,685.16 1300.5,685.16 cw(c1300.5,689.66) 1300.5,694.16 1305.5,694.16 ccw(c1305.5,706.66) 1318,706.66 ccw(c1305.5,706.66) 1307,719.07 1307,738.69 1326.33,758.02 ccw(c1321.74,762.62) 1328.24,762.62 ccw(c1321.74,762.62) 1326.33,767.21 cw(c1329.52,770.4) 1326.32,773.56 cw(c1329.52,770.4) 1332.7,773.58 1336.23,770.04 ccw(c1345.07,778.88) 1357.57,778.88 ccw(c1345.07,778.88) 1353.91,787.72 1350.38,791.25 cw(c1353.56,794.44) 1350.36,797.6 cw(c1353.56,794.44) 1356.74,797.62 1360.28,794.08 ccw(c1369.11,802.92) 1381.61,802.92 ccw(c1369.11,802.92) 1377.95,811.76 1374.42,815.3 cw(c1377.6,818.48) 1374.4,821.65 cw(c1377.6,818.48) 1380.78,821.66 1384.32,818.12 ccw(c1393.16,826.96) 1405.66,826.96 ccw(c1393.16,826.96) 1402.99,834.68 1419.53,851.22 J1.35@1460,851.22
MIPI0_D1_P: J1.36 U3.G10 | length 1077.8
  Top1 w4: U3.G10@1067.36,358.82 1125.51,358.82 1132.52,365.83 ccw(c1129.34,369.02) 1132.52,372.2 1131.81,372.91 cw(c1135,376.09) 1131.81,379.27 cw(c1135,376.09) 1138.18,379.27 1138.88,378.56 ccw(c1142.07,381.74) 1145.25,378.56 ccw(c1142.07,381.74) 1145.25,384.93 1144.54,385.63 cw(c1147.72,388.82) 1144.54,392 cw(c1147.72,388.82) 1150.91,392 1151.61,391.29 ccw(c1154.79,394.47) 1157.98,391.29 ccw(c1154.79,394.47) 1157.98,397.65 1157.27,398.36 cw(c1160.45,401.54) 1157.27,404.73 cw(c1160.45,401.54) 1163.63,404.73 1164.34,404.02 ccw(c1167.52,407.2) 1170.7,404.02 ccw(c1167.52,407.2) 1170.7,410.38 1170,411.09 cw(c1173.18,414.27) 1170,417.45 cw(c1173.18,414.27) 1176.36,417.45 1177.07,416.75 ccw(c1180.25,419.93) 1183.43,416.75 1186.61,419.93 1188.34,421.66 1210.25,443.56 cw(c1220.08,451.27) 1228.92,460.11 1232.46,456.58 ccw(c1235.64,459.76) 1238.81,456.56 ccw(c1235.64,459.76) 1240.14,459.76 ccw(c1235.64,459.76) 1238.83,462.93 1235.28,466.48 cw(c1244.12,475.32) 1252.96,484.15 1256.5,480.62 ccw(c1259.68,483.8) 1262.85,480.6 ; 1262.86,480.62 ccw(c1259.68,483.8) 1264.18,483.8 ccw(c1259.68,483.8) 1262.86,486.98 1259.33,490.52 cw(c1268.16,499.36) 1277,508.2 1280.54,504.66 ccw(c1283.72,507.84) 1286.89,504.65 ; 1286.9,504.66 ccw(c1283.72,507.84) 1288.22,507.84 ccw(c1283.72,507.84) 1286.9,511.02 cw(c1291.5,515.62) 1286.9,520.22 1299,532.31 1299,559.66 cw(c1305.5,559.66) 1305.5,566.16 ccw(c1305.5,570.66) 1310,570.66 ccw(c1305.5,570.66) 1305.5,575.16 1300.5,575.16 cw(c1300.5,587.66) 1300.5,600.16 1305.5,600.16 ccw(c1305.5,604.66) 1310,604.66 ccw(c1305.5,604.66) 1305.5,609.16 1300.5,609.16 cw(c1300.5,621.66) 1300.5,634.16 1305.5,634.16 ccw(c1305.5,638.66) 1310,638.66 ccw(c1305.5,638.66) 1305.5,643.16 1300.5,643.16 cw(c1300.5,655.66) 1300.5,668.16 1305.5,668.16 ccw(c1305.5,672.66) 1310,672.66 ccw(c1305.5,672.66) 1305.5,677.16 1300.5,677.16 cw(c1300.5,689.66) 1300.5,702.16 1305.5,702.16 ccw(c1305.5,706.66) 1310,706.66 ccw(c1305.5,706.66) 1305.5,711.16 cw(c1305.5,717.66) 1299,717.66 1299,742 1319.68,762.68 cw(c1329.52,770.4) 1338.36,779.23 1341.89,775.7 ccw(c1345.07,778.88) 1348.24,775.68 ; 1348.25,775.7 ccw(c1345.07,778.88) 1349.57,778.88 ccw(c1345.07,778.88) 1348.25,782.06 1344.72,785.6 cw(c1353.56,794.44) 1362.4,803.28 1365.93,799.74 ccw(c1369.11,802.92) 1372.28,799.73 ccw(c1369.11,802.92) 1373.61,802.92 ccw(c1369.11,802.92) 1372.3,806.1 1368.76,809.64 cw(c1377.6,818.48) 1386.44,827.32 1389.97,823.78 ccw(c1393.16,826.96) 1396.32,823.77 ccw(c1393.16,826.96) 1397.66,826.96 ccw(c1393.16,826.96) 1396.34,830.15 cw(c1400.93,834.74) 1396.34,839.34 1413.88,856.88 1427.9,870.9 J1.36@1460,870.9
MIPI0_D2_N: J1.41 U3.E9 | length 1078
  Top1 w4: U3.E9@1041.77,410 1054.57,397.2 1067.36,397.2 1090.2,397.2 1097,404 1099.83,406.83 1104.78,411.78 cw(c1105.49,411.07) 1106.19,411.78 ccw(c1109.02,414.61) 1111.85,411.78 ccw(c1109.02,414.61) 1111.85,417.43 cw(c1112.56,418.14) 1111.85,418.85 1116.09,423.09 cw(c1116.8,422.38) 1117.51,423.09 ccw(c1120.33,425.92) 1123.16,423.09 ccw(c1120.33,425.92) 1123.16,428.75 cw(c1123.87,429.46) 1123.16,430.16 1126,433 1224,531 1224,559 ccw(c1217.5,559) 1217.5,565.5 cw(c1217.5,571) 1217.5,576.5 1222.5,576.5 ccw(c1222.5,590) 1236,590 ccw(c1222.5,590) 1222.5,603.5 1217.5,603.5 cw(c1217.5,609) 1217.5,614.5 1222.5,614.5 ccw(c1222.5,628) 1236,628 ccw(c1222.5,628) 1222.5,641.5 1217.5,641.5 cw(c1217.5,647) 1217.5,652.5 1222.5,652.5 ccw(c1222.5,666) 1236,666 ccw(c1222.5,666) 1222.5,679.5 1217.5,679.5 cw(c1217.5,685) 1217.5,690.5 1222.5,690.5 ccw(c1222.5,704) 1236,704 ccw(c1222.5,704) 1222.5,717.5 1217.5,717.5 cw(c1217.5,723) 1217.5,728.5 1222.5,728.5 ccw(c1222.5,742) 1236,742 ccw(c1222.5,742) 1224,755.42 1224,774.69 1244.45,795.14 ccw(c1252.88,805.69) 1266.38,805.69 ccw(c1252.88,805.69) 1262.43,815.23 1258.89,818.77 cw(c1262.78,822.66) 1258.88,826.53 ; 1258.89,826.55 cw(c1262.78,822.66) 1266.67,826.55 1270.2,823.01 ccw(c1279.75,832.56) 1293.25,832.56 ccw(c1279.75,832.56) 1289.3,842.1 1285.76,845.64 cw(c1289.65,849.53) 1285.75,853.4 ; 1285.76,853.42 cw(c1289.65,849.53) 1293.54,853.42 1297.07,849.88 ccw(c1306.62,859.43) 1320.12,859.43 ccw(c1306.62,859.43) 1316.17,868.97 1312.63,872.51 cw(c1316.52,876.4) 1312.62,880.27 cw(c1316.52,876.4) 1320.41,880.29 1323.94,876.75 ccw(c1333.49,886.3) 1346.99,886.3 ccw(c1333.49,886.3) 1344.04,894.72 1418.64,969.33 J1.41@1460,969.33
MIPI0_D2_P: J1.42 U3.E10 | length 1075.8
  Top1 w4: U3.E10@1067.36,410 1091,410 1102,421 1102.71,421.71 ccw(c1100.23,424.18) 1102.71,426.66 cw(c1105.89,429.84) 1102.71,433.02 cw(c1105.89,429.84) 1109.07,433.02 ccw(c1111.55,435.49) 1114.02,433.02 1115.44,434.44 ccw(c1112.96,436.91) 1115.44,439.38 cw(c1118.62,442.57) 1115.44,445.75 cw(c1118.62,442.57) 1121.8,445.75 ccw(c1124.27,448.22) 1126.75,445.75 1128.16,447.16 ccw(c1125.69,449.64) 1128.16,452.11 cw(c1131.35,455.29) 1128.16,458.48 cw(c1131.35,455.29) 1134.53,458.48 ccw(c1137,460.95) 1139.48,458.48 1140.89,459.89 ccw(c1138.42,462.37) 1140.89,464.84 cw(c1144.07,468.02) 1140.89,471.2 cw(c1144.07,468.02) 1147.26,471.2 ccw(c1149.73,473.68) 1152.2,471.2 1155,474 1216,535 1216,557.58 cw(c1217.5,571) 1217.5,584.5 1222.5,584.5 ccw(c1222.5,590) 1228,590 ccw(c1222.5,590) 1222.5,595.5 1217.5,595.5 cw(c1217.5,609) 1217.5,622.5 1222.5,622.5 ccw(c1222.5,628) 1228,628 ccw(c1222.5,628) 1222.5,633.5 1217.5,633.5 cw(c1217.5,647) 1217.5,660.5 1222.5,660.5 ccw(c1222.5,666) 1228,666 ccw(c1222.5,666) 1222.5,671.5 1217.5,671.5 cw(c1217.5,685) 1217.5,698.5 1222.5,698.5 ccw(c1222.5,704) 1228,704 ccw(c1222.5,704) 1222.5,709.5 1217.5,709.5 cw(c1217.5,723) 1217.5,736.5 1222.5,736.5 ccw(c1222.5,742) 1228,742 ccw(c1222.5,742) 1222.5,747.5 cw(c1222.5,754) 1216,754 1216,778 1239.8,801.8 cw(c1244.4,797.2) 1248.99,801.8 ccw(c1252.88,805.69) 1256.75,801.78 ; 1256.77,801.8 ccw(c1252.88,805.69) 1258.38,805.69 ccw(c1252.88,805.69) 1256.77,809.58 1253.23,813.11 cw(c1262.78,822.66) 1272.33,832.2 1275.86,828.67 ccw(c1279.75,832.56) 1283.62,828.65 ccw(c1279.75,832.56) 1285.25,832.56 ccw(c1279.75,832.56) 1283.64,836.45 1280.1,839.98 cw(c1289.65,849.53) 1299.2,859.07 1302.73,855.54 ccw(c1306.62,859.43) 1310.49,855.52 ; 1310.51,855.54 ccw(c1306.62,859.43) 1312.12,859.43 ccw(c1306.62,859.43) 1310.51,863.32 1306.97,866.85 cw(c1316.52,876.4) 1326.07,885.94 1329.6,882.41 ccw(c1333.49,886.3) 1337.36,882.39 ; 1337.38,882.41 ccw(c1333.49,886.3) 1338.99,886.3 ccw(c1333.49,886.3) 1337.38,890.19 cw(c1341.98,894.78) 1337.38,899.38 1427.02,989.02 J1.42@1460,989.02
MIPI0_D3_N: J1.44 U3.D9 | length 1076.5
  Top1 w4: U3.D9@1041.77,435.59 1054.57,422.79 1067.36,422.79 1077.79,422.79 1084.59,429.59 1187,532 1187,797.69 1206.9,817.59 ccw(c1201.6,822.89) 1209.1,822.89 ccw(c1201.6,822.89) 1206.9,828.19 cw(c1210.79,832.08) 1206.88,835.96 cw(c1210.79,832.08) 1214.68,835.97 1219.63,831.02 ccw(c1229.17,840.57) 1242.67,840.57 ccw(c1229.17,840.57) 1238.72,850.11 1233.77,855.06 cw(c1237.66,858.95) 1233.75,862.83 cw(c1237.66,858.95) 1241.55,862.84 1246.5,857.89 ccw(c1256.04,867.44) 1269.54,867.44 ccw(c1256.04,867.44) 1265.59,876.98 1260.64,881.93 cw(c1264.53,885.82) 1260.62,889.7 cw(c1264.53,885.82) 1268.42,889.71 1273.37,884.76 ccw(c1282.91,894.31) 1296.41,894.31 ccw(c1282.91,894.31) 1292.46,903.85 1287.51,908.8 cw(c1291.4,912.69) 1287.49,916.57 ; 1287.51,916.58 cw(c1291.4,912.69) 1295.29,916.58 1300.24,911.63 ccw(c1309.78,921.18) 1323.28,921.18 ccw(c1309.78,921.18) 1319.33,930.72 1314.38,935.67 cw(c1318.27,939.56) 1314.36,943.44 ; 1314.38,943.45 cw(c1318.27,939.56) 1322.16,943.45 1327.11,938.5 ccw(c1336.65,948.05) 1350.15,948.05 ccw(c1336.65,948.05) 1346.2,957.59 1341.25,962.54 cw(c1345.14,966.43) 1341.23,970.31 cw(c1345.14,966.43) 1349.03,970.32 1353.98,965.37 ccw(c1363.52,974.92) 1377.02,974.92 ccw(c1363.52,974.92) 1373.07,984.46 1368.12,989.41 cw(c1372.01,993.3) 1368.1,997.18 cw(c1372.01,993.3) 1375.9,997.19 1380.85,992.24 ccw(c1390.39,1001.79) 1403.89,1001.79 ccw(c1390.39,1001.79) 1400.29,1010.97 1417.7,1028.39 J1.44@1460,1028.39